# Altium PCB LED_grow_panel.PcbDoc
Units mm, origin at the board's own origin, x right, y up, seen from the top; angles counter-clockwise.
Board outline 100 x 100 mm, 2 copper layers (Top Layer, Bottom Layer), stack 1.736 mm thick; 59 components, 35 nets, 184 pads, 0 vias.
Unrouted connection lines stored in the file: 4.
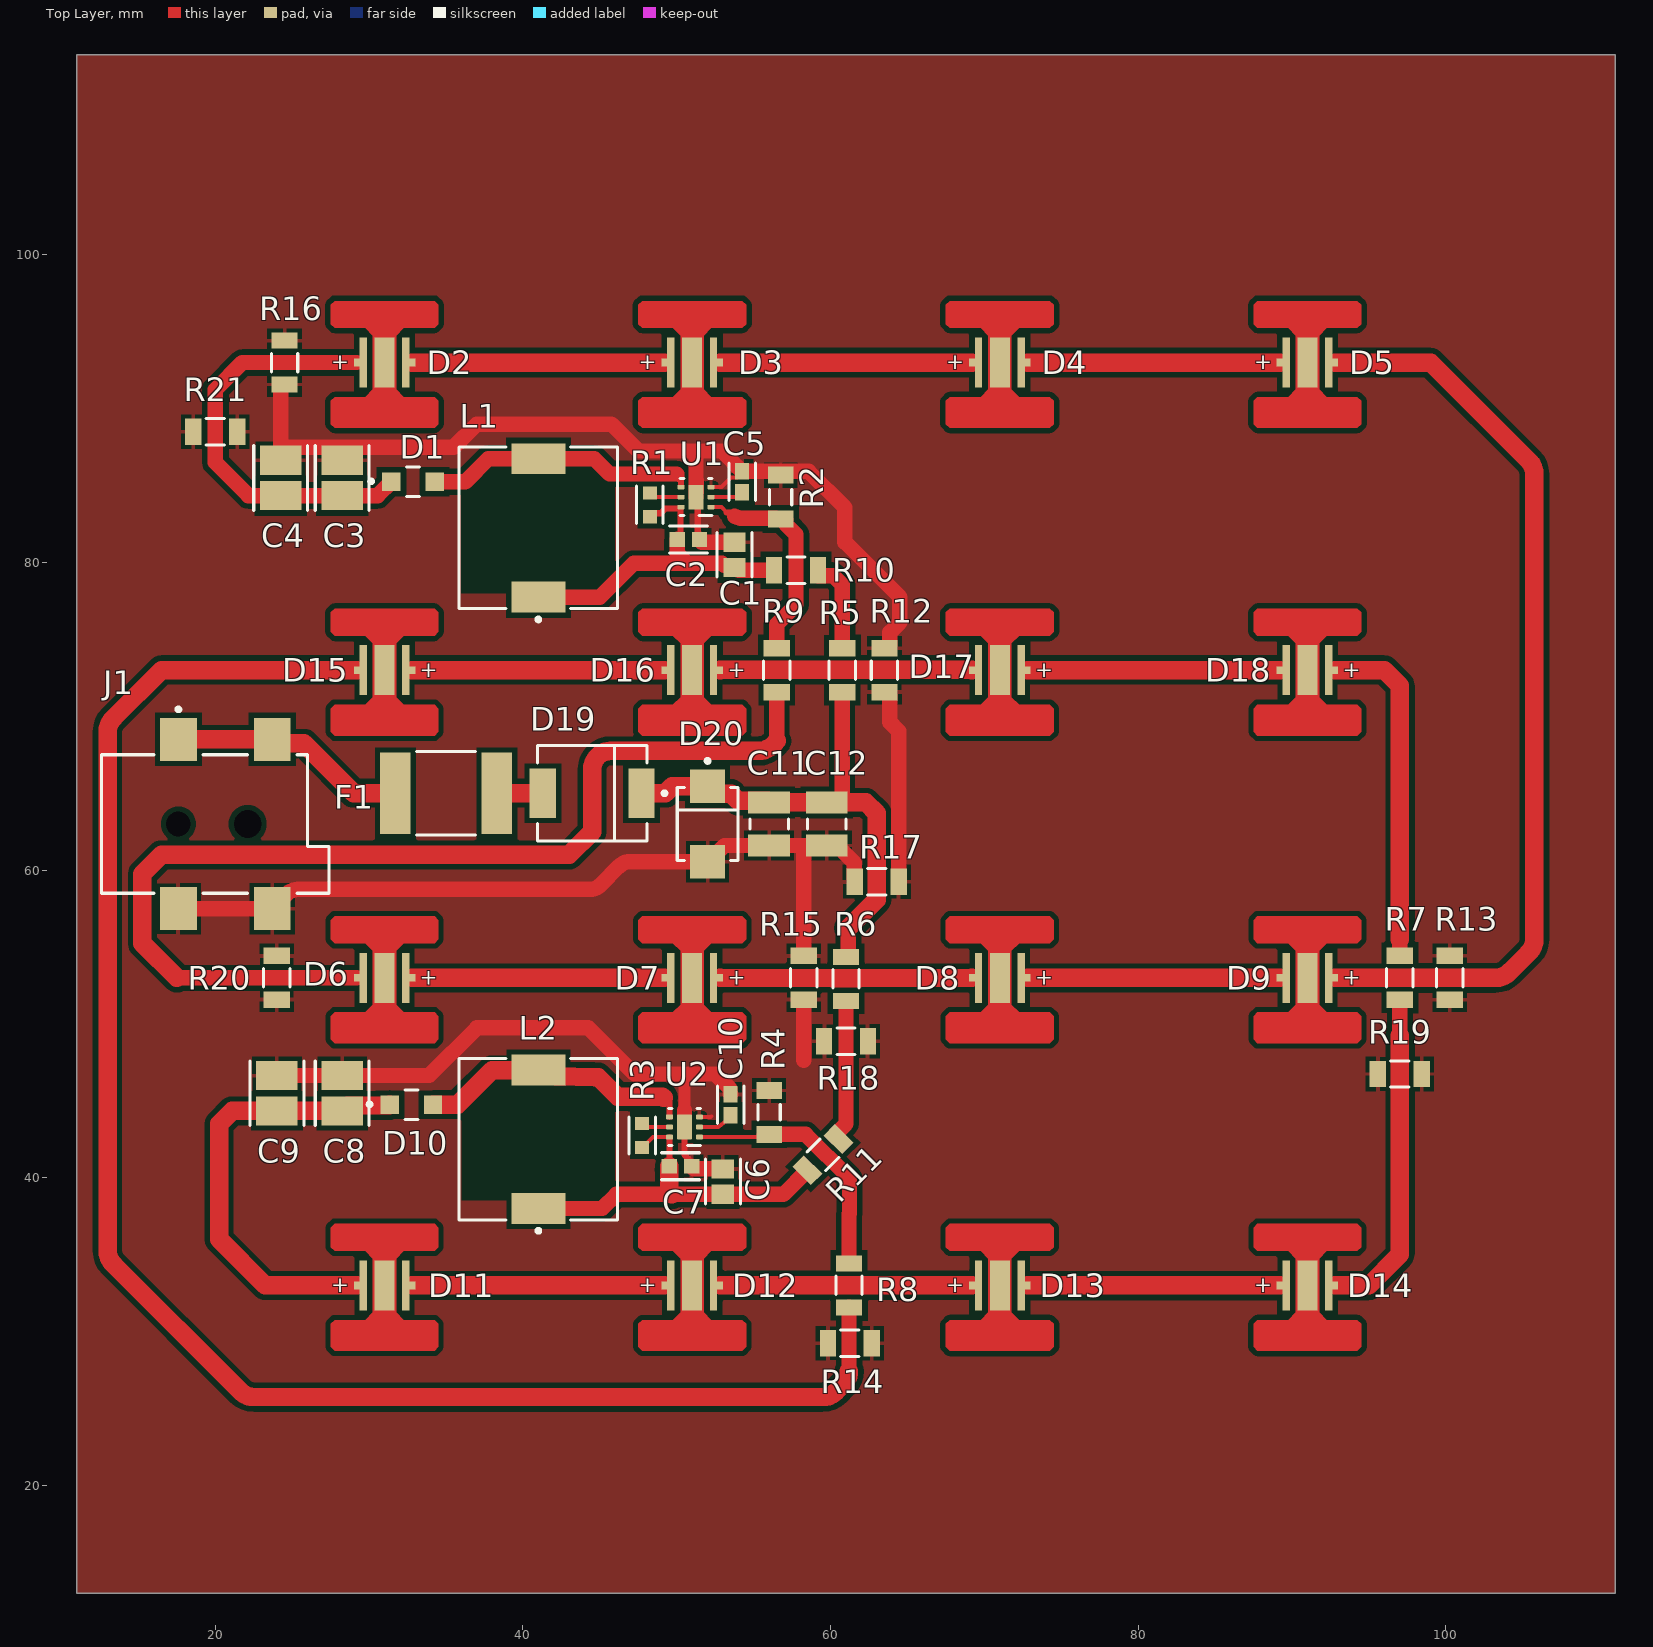
[diagram p0: Top Layer view]
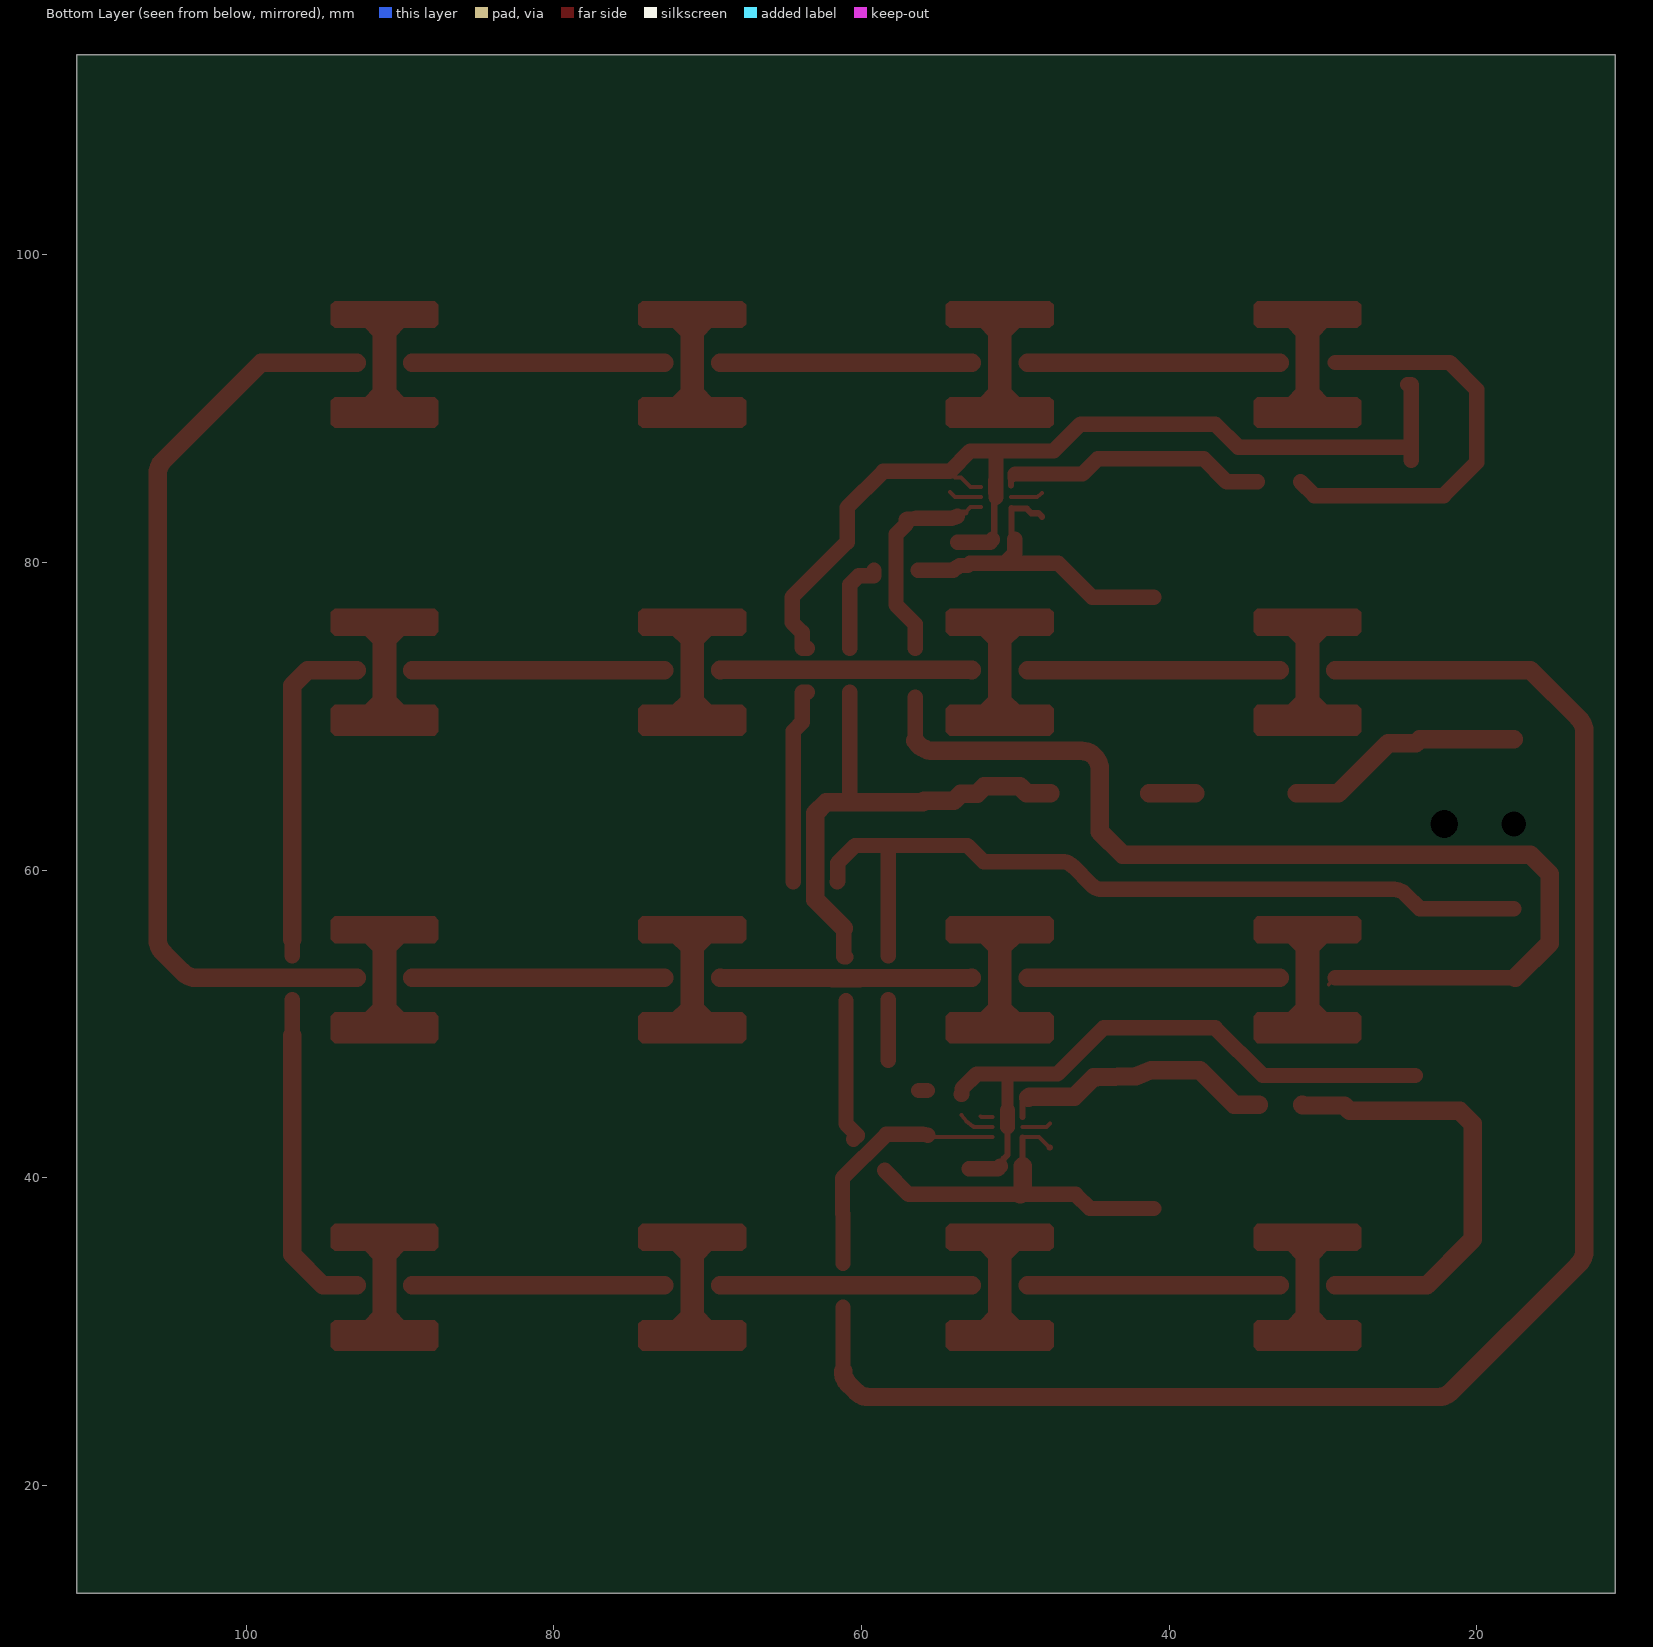
[diagram p1: Bottom Layer view, seen from below]

## Layer stack, top to bottom
Top Solder: solder mask 0.0102, Solder Resist, Dk 3.5
Top Layer: signal copper 0.0356
Dielectric 1: dielectric 0.1, Thermally conductive, Dk 4.8
Bottom Layer: signal copper 1.6
Bottom Solder: solder mask 0.0102, Solder Resist, Dk 3.5

## Board outline
11,13 11,113 111,113 111,13

## Design rules (kind name [scope] priority, off if disabled: settings)
Clearance [All] p1: gap=0.15 ignorepadtopadclearanceinfootprint=FALSE except(0.35: Arc-Fill Arc-Poly Arc-Region Track-Fill Track-Poly Track-Region SMDPad-Fill SMDPad-Poly SMDPad-Region THPad-Fill THPad-Poly THPad-Region Fill-Fill Fill-Poly Fill-Region Poly-Poly Poly-Region Region-Region)
PolygonConnect [All] p1: connectstyle=Relief reliefconductorwidth=0.254 reliefentries=4 polygonreliefangle="90 Angle" airgapwidth=0.254
RoutingVias [All] p1: holewidth=0.711 width=1.27 viastyle="Through Hole" minholewidth=0.711 minwidth=1.27 maxholewidth=0.711 maxwidth=1.27
SolderMaskExpansion [All] p1: expansion=0.102 istentingtop=FALSE
Width [All] p1: maxlimit=1.2 minlimit=0.254 preferedwidth=0.254
30 further rules are at their usual default settings.

## Components (designator, comment, footprint, x,y, rotation, side; value= is the part's Value field where it differs from the comment)
C1 "GRM21BZ71E475KE15L" FP-GRM21B-0_2-e0_2_0_7-IPC_B 53.75,80.5 r90 top value=4.7µF
C2 "C0603C104K5RACTU" FP-C0603C-CF-IPC_B 50.75,81.5 r0 top value="0.10 μF"
C3 "GCM32ER71H475KA55K" FP-GCM32E-0_3-IPC_B 28.25,85.5 r270 top
C4 "GCM32ER71H475KA55K" FP-GCM32E-0_3-IPC_B 24.25,85.5 r270 top
C5 "CC0603KRX7R9BB224" FP-CC0603-DA-IPC_B 54.25,85.25 r90 top value="220 nF"
C6 "GRM21BZ71E475KE15L" FP-GRM21B-0_2-e0_2_0_7-IPC_B 53,39.75 r90 top value=4.7µF
C7 "C0603C104K5RACTU" FP-C0603C-CF-IPC_B 50.25,40.75 r0 top value="0.10 μF"
C8 "GCM32ER71H475KA55K" FP-GCM32E-0_3-IPC_B 28.25,45.5 r270 top
C9 "GCM32ER71H475KA55K" FP-GCM32E-0_3-IPC_B 24,45.5 r270 top
C10 "CC0603KRX7R9BB224" FP-CC0603-DA-IPC_B 53.5,44.75 r90 top value="220 nF"
C11 "C1210C226K3RACTU" FP-C1210C226K3RACTU-IPC_B 56,63 r270 top value=22uF
C12 "C1210C226K3RACTU" FP-C1210C226K3RACTU-IPC_B 59.75,63 r270 top value=22uF
D1 "PMEG6020ER,115" FP-SOD123W-MFG 32.85,85.25 r0 top
D2 "150353DS74500" WL-SMDC_3535 -1239,-1177 r180 top
D3 "150353DS74500" WL-SMDC_3535 -1219,-1177 r180 top
D4 "150353DS74500" WL-SMDC_3535 -1199,-1177 r180 top
D5 "150353DS74500" WL-SMDC_3535 -1179,-1177 r180 top
D6 "150353DS74500" WL-SMDC_3535 1301,1323 r0 top
D7 "150353DS74500" WL-SMDC_3535 1321,1323 r0 top
D8 "150353DS74500" WL-SMDC_3535 1341,1323 r0 top
D9 "150353DS74500" WL-SMDC_3535 1361,1323 r0 top
D10 "PMEG6020ER,115" FP-SOD123W-MFG 32.75,44.75 r0 top
D11 "150353FS74500" WL-SMDC_3535 -1239,-1237 r180 top
D12 "150353FS74500" WL-SMDC_3535 -1219,-1237 r180 top
D13 "150353FS74500" WL-SMDC_3535 -1199,-1237 r180 top
D14 "150353FS74500" WL-SMDC_3535 -1179,-1237 r180 top
D15 "150353FS74500" WL-SMDC_3535 1301,1343 r0 top
D16 "150353FS74500" WL-SMDC_3535 1321,1343 r0 top
D17 "150353FS74500" WL-SMDC_3535 1341,1343 r0 top
D18 "150353FS74500" WL-SMDC_3535 1361,1343 r0 top
D19 "SSC54-E3/57T" FP-95402-MFG 44.5,65 r180 top
D20 "P6SMB18A" FP-P6SMB-MFG 52,63 r270 top
F1 "MF-LSMF200/33X" FP-MF-LSMF-MFG 35,65 r0 top value=0.045-0.15Ω
J1 "PJ-002AH-SMT-TR" CUI-PJ-002AH-4_V 20,63 r0 top
L1 "7447713220" WE-PD_1030P -1229,-1187.75 r180 top
L2 "7447713220" WE-PD_1030P -1229,-1227.5 r180 top
R1 "RC0603FR-07100KL" FP-RC0603-0_55-IPC_B 48.25,83.75 r90 top
R2 "ERJ8BQFR56V" RESC3216X70X50NL05T20 56.75,84.25 r270 top value=560mΩ
R3 "RC0603FR-07100KL" FP-RC0603-0_55-IPC_B 47.75,42.75 r90 top
R4 "ERJ8BQFR56V" RESC3216X70X50NL05T20 56,44.25 r270 top value=560mΩ
R5 "RC1206JR-070RL" FP-RC1206-IPC_B 60.75,73 r90 top value=0Ω
R6 "RC1206JR-070RL" FP-RC1206-IPC_B 61,52.927 r270 top value=0Ω
R7 "RC1206JR-070RL" FP-RC1206-IPC_B 97,53 r90 top value=0Ω
R8 "RC1206JR-070RL" FP-RC1206-IPC_B 61.193,33 r270 top value=0Ω
R9 "RC1206JR-070RL" FP-RC1206-IPC_B 56.5,73 r270 top value=0Ω
R10 "RC1206JR-070RL" FP-RC1206-IPC_B 57.75,79.5 r180 top value=0Ω
R11 "RC1206JR-070RL" FP-RC1206-IPC_B 59.5,41.5 r225 top value=0Ω
R12 "RC1206JR-070RL" FP-RC1206-IPC_B 63.5,73 r90 top value=0Ω
R13 "RC1206JR-070RL" FP-RC1206-IPC_B 100.25,53 r90 top value=0Ω
R14 "RC1206JR-070RL" FP-RC1206-IPC_B 61.25,29.25 r0 top value=0Ω
R15 "RC1206JR-070RL" FP-RC1206-IPC_B 58.25,53 r90 top value=0Ω
R16 "RC1206JR-070RL" FP-RC1206-IPC_B 24.5,93 r90 top value=0Ω
R17 "RC1206JR-070RL" FP-RC1206-IPC_B 63,59.25 r180 top value=0Ω
R18 "RC1206JR-070RL" FP-RC1206-IPC_B 61,48.875 r0 top value=0Ω
R19 "RC1206JR-070RL" FP-RC1206-IPC_B 97,46.75 r0 top value=0Ω
R20 "RC1206JR-070RL" FP-RC1206-IPC_B 24,53 r90 top value=0Ω
R21 "RC1206JR-070RL" FP-RC1206-IPC_B 20,88.5 r0 top value=0Ω
U1 "TPS61165DRVT" DRV0006A_V 51.25,84.25 r180 top
U2 "TPS61165DRVT" DRV0006A_V 50.5,43.3 r180 top

## Footprints (in the part's own frame and the unit in brackets; to place one, negate y for a bottom-side part, rotate by r counter-clockwise, add the part's x,y. Pads: shape width x height; smd on the part's side, far side on the other; paste and mask are expansions set on the pad)
CUI-PJ-002AH-4_V [mm] "SMD, 4-Leads, Body 14.8x9 mm, Pitch 6.1mm"
  rect 2.4x2.8 smd: 1(-2.4,5.5) 1(3.7,5.5) 2(-2.4,-5.5) 3(3.7,-5.5)
  round 0 hole 1.6: MH1(-2.4,0)
  round 0 hole 1.8: MH2(2.1,0)
  silkscreen extent -7.4,-4.5 7.4,7.57, body extent -7.4,-6.3 7.4,6.3, height 11.2
DRV0006A_V [mm] "SON, 6-Leads, Body 2x2mm, Pitch 0.65mm, Thermal Pad 1.6x1mm, TI Recommended"
  rrect33% 0.45x0.3 smd: 1(-0.975,0.65) 2(-0.975,0) 3(-0.975,-0.65) 4(0.975,-0.65) 5(0.975,0) 6(0.975,0.65)
  rrect14% 1x0.7 on Top Paste: 7(0,0.45) 7(0,-0.45)
  rrect10% 1x1.6 smd paste-0.5: 7(0,0)
  silkscreen extent -1.05,-1.2 1.05,1.2, body extent -1.05,-1.05 1.05,1.05, height 0.81
FP-95402-MFG [mm]
  rect 1.72x3.2 smd paste+0 mask+0: 1(-3.205,0) 2(3.205,0)
  silkscreen extent -4.83,-3.11 3.55,3.11, body extent -4.17,-3.21 4.17,3.21, height 0.25
FP-C0603C-CF-IPC_B [mm]
  rect 1.007x0.958 smd paste+0 mask+0: 1(-0.726,0) 2(0.726,0)
  silkscreen extent -1.23,-0.88 1.23,0.88, body extent -1.48,-0.73 1.48,0.73, height 0.25
FP-C1210C226K3RACTU-IPC_B [mm]
  rect 1.403x2.726 smd paste+0 mask+0: 1(-1.4,0) 2(1.4,0)
  silkscreen extent -0.32,-1.25 0.32,1.25, body extent -2.35,-1.61 2.35,1.61, height 0.25
FP-CC0603-DA-IPC_B [mm]
  rect 1.058x0.912 smd paste+0 mask+0: 1(-0.677,0) 2(0.677,0)
  silkscreen extent -1.21,-0.86 1.21,0.86, body extent -1.46,-0.71 1.46,0.71, height 0.25
FP-GCM32E-0_3-IPC_B [mm]
  rect 1.903x2.706 smd paste+0 mask+0: 1(-1.151,0) 2(1.151,0)
  silkscreen extent -2.1,-1.75 2.1,1.75, body extent -2.35,-1.6 2.35,1.6, height 0.25
FP-GRM21B-0_2-e0_2_0_7-IPC_B [mm]
  rect 1.255x1.456 smd paste+0 mask+0: 1(-0.826,0) 2(0.826,0)
  silkscreen extent -1.45,-1.13 1.45,1.13, body extent -1.7,-0.98 1.7,0.98, height 0.25
FP-MF-LSMF-MFG [mm]
  rect 2x5.3 smd paste+0 mask+0: 1(-3.3,0) 2(3.3,0)
  silkscreen extent -1.92,-2.72 1.92,2.72, body extent -4.4,-2.82 4.4,2.82, height 0.25
FP-P6SMB-MFG [mm]
  rect 2.16x2.26 smd paste+0 mask+0: 1(-2.45,0) 2(2.45,0)
  silkscreen extent -4.22,-1.97 2.37,1.97, body extent -3.63,-2.07 3.63,2.07, height 0.25
FP-RC0603-0_55-IPC_B [mm]
  rect 0.859x0.912 smd paste+0 mask+0: 1(-0.777,0) 2(0.777,0)
  silkscreen extent -1.21,-0.86 1.21,0.86, body extent -1.46,-0.71 1.46,0.71, height 0.25
FP-RC1206-IPC_B [mm]
  rect 1.058x1.712 smd paste+0 mask+0: 1(-1.427,0) 2(1.427,0)
  silkscreen extent -0.6,-0.86 0.6,0.86, body extent -2.21,-1.11 2.21,1.11, height 0.25
FP-SOD123W-MFG [mm]
  rect 1.2x1.2 smd paste-1000 mask+0: 1(-1.4,0) 2(1.4,0)
  silkscreen extent -2.85,-0.95 0.43,0.95, body extent -2.2,-1.05 2.2,1.05, height 0.25
RESC3216X70X50NL05T20 [mm] "Chip Resistor, 2-Leads, Body 3.20x1.60mm, IPC Medium Density"
  rect 1.1x1.65 smd: 1(-1.425,0) 2(1.425,0)
  silkscreen extent -0.5,-0.72 0.5,0.72, body extent -1.63,-0.82 1.62,0.82, height 0.7
WE-PD_1030P [mm] "SMD Shielded Power Inductor, 2-leads, body 10x10mm"
  rect 3.5x2 smd: 1(-1270,-1265.5) 2(-1270,-1274.5)
  silkscreen extent -1275.15,-1275.25 -1264.85,-1263.93, body extent -1275,-1275 -1265,-1265, height 2.85
WL-SMDC_3535 [mm] "SMD Mono-color Ceramic LED Waterclear, body 3.4x3.4mm, 2-leads"
  rect 0.375x0.5 smd: 1(-1271.813,-1270) 2(-1268.187,-1270)
  rect 0.48x3.25 smd: 1(-1271.385,-1270) 2(-1268.615,-1270)
  rect 1.3x3.25 smd: "Thermal Pad"(-1270,-1270)
  body extent -1271.7,-1271.7 -1268.3,-1268.3, height 2.1

## Part data
C1 C6: library part CMP-06035-039079-1, "Chip Multilayer Ceramic Capacitors for General Purpose, 0805, 4.7uF, X7R, 15%, 10%, 25V", Case/Package=0805, Dielectric Material=Ceramic, Manufacturer=Murata, Manufacturer Lifecycle Status="IN PRODUCTION", Max Operating Temperature=125°C, Min Operating Temperature=-55°C, Supplier Part Number=490-GRM21BZ71E475KE15LCT-ND, Tolerance=10%, Voltage Rating=25V, Category="Ceramic Capacitors", ComponentLink1Description=https://datasheet.octopart.com:443/GRM21BZ71E475KE15L-Murata-datasheet-155345087.pdf?src-supplier=Newark, ComponentLink1URL=https://datasheet.octopart.com:443/GRM21BZ71E475KE15L-Murata-datasheet-155345087.pdf?src-supplier=Newark, ComponentLink2Description=https://datasheet.octopart.com:443/GRM21BZ71E475KE15L-Murata-datasheet-141278877.pdf?src-supplier=Geoflip, ComponentLink2URL=https://datasheet.octopart.com:443/GRM21BZ71E475KE15L-Murata-datasheet-141278877.pdf?src-supplier=Geoflip, ComponentLink3Description=https://datasheet.octopart.com:443/GRM21BZ71E475KE15L-Murata-datasheet-165579666.pdf?src-supplier=TME, ComponentLink3URL=https://datasheet.octopart.com:443/GRM21BZ71E475KE15L-Murata-datasheet-165579666.pdf?src-supplier=TME, ComponentLink4Description=https://datasheet.octopart.com:443/GRM21BZ71E475KE15L-Murata-datasheet-140707839.pdf?src-supplier=Ciiva, ComponentLink4URL=https://datasheet.octopart.com:443/GRM21BZ71E475KE15L-Murata-datasheet-140707839.pdf?src-supplier=Ciiva, ComponentLink5Description=https://datasheet.octopart.com:443/GRM21BZ71E475KE15L-Murata-datasheet-138745135.pdf?src-supplier=Ciiva, ComponentLink5URL=https://datasheet.octopart.com:443/GRM21BZ71E475KE15L-Murata-datasheet-138745135.pdf?src-supplier=Ciiva, ComponentLink6Description=http://sigma.octopart.com:80/reach_statement/Murata-company-16.pdf?src-supplier=Compliance+Statements, ComponentLink6URL=http://sigma.octopart.com:80/reach_statement/Murata-company-16.pdf?src-supplier=Compliance+Statements, Export Control Classification Number (ECCN) Code=EAR99, Harmonized Tariff Schedule (HTS) Code=8532.24.00.20, Height=1.25mm, Introduction Date=2017-02-22, Length=2mm, Lifecycle Status=Production, Manufacturer Part Number=GRM21BZ71E475KE15L, Material=Ceramic, Mounting Technology="Surface Mount", Number of Terminals=2, Pricing="1=0,28, 10=0,164, 50=0,1184, 100=0,1046, 500=0,08132, 1000=0,07413 (USD)", REACH SVHC=Yes, RoHS=Compliant, Stock=127456, Supplier=DigiKey, Thickness=1.25mm, Voltage Rating (DC)=25V, Width=1.25mm
C2 C7: library part CMP-2006-03061-2, "CAP CER 0.1UF 50V X7R 0603", Capacitance="0.10 μF", Manufacturer=KEMET, Package=C0603C-CF, Temperature="-55°C to +125°C", Temperature Characteristic=X7R, Temperature Coefficient=30ppm/°C, Temperature Range High=+125°C, Temperature Range Low=-55°C, Tolerance=0.1, Voltage Rating="50 V", Automotive=Yes, Automotive Grade="Grade 1", Category=Cap, ComponentLink2Description=Datasheet, ComponentLink2URL=https://api.kemet.com/component-edge/download/datasheet/C0603C100J5GACAUTO.pdf, Device Class L1="Passive Components", Device Class L2=Capacitors, Device Class L3="Ceramic Capacitors", Digikey Description="CAP CER 0.1UF 50V X7R 0603", Height=0.87mm, Lead Free=Yes, Manufacturer Part Number=C0603C104K5RACTU, Material=Ceramic, Octopart=https://octopart.com/c0603c104k5ractu-kemet-139244, RoHS=TRUE
C3 C4 C8 C9: library part CMP-06035-058874-1, "Ceramic Capacitor for Automotive 4.7uF ±10% 50VDC X7R 1210 Embossed T/R", Capacitance=4.7uF, Case Code (Imperial)=1210, Case Code (Metric)=3225, Dielectric=X7R, Max Operating Temperature=125°C, Min Operating Temperature=-55°C, Package Quantity=1, Ratings=AEC-Q200, Tolerance=10%, Voltage Rating=50V, Case/Package=1210, Depth=2.5mm, Height=2.5mm, Length=3.2mm, Mount="Surface Mount", Packaging="Tape and Reel", Radiation Hardening=No, Termination=SMD/SMT, Thickness=0.106inch, Voltage Rating (DC)=50V, Width=0.098inch
C5 C10: library part CMP-03422-001373-1, "0.22µF 50V Ceramic Capacitor X7R 0603 (1608 Metric) 0.063\" L x 0.031\" W (1.60mm x 0.80mm)", Capacitance="220 nF", Manufacturer=YAGEO, Package=CC0603-DA, Temperature="-55°C to +125°C", Temperature Characteristic=X7R, Temperature Coefficient=15%, Temperature Range High=+125°C, Temperature Range Low=-55°C, Tolerance=0.1, Voltage="50 V", Automotive=No, Category=Cap, ComponentLink2Description=Datasheet, ComponentLink2URL=http://www.yageo.com/documents/recent/UPY-GPHC_X7R_6.3V-to-50V_18.pdf, Device Class L1="Passive Components", Device Class L2=Capacitors, Device Class L3="Ceramic Capacitors", Digikey Description="0.22µF 50V Ceramic Capacitor X7R 0603 (1608 Metric) 0.063\" L x 0.031\" W (1.60mm x 0.80mm)", Footprint Url=http://www.yageo.com/exep/pages/download/literatures/UPY-C_GEN_24.pdf, Height=0.9mm, Lead Free=Yes, Manufacturer Part Number=CC0603KRX7R9BB224, Material=Ceramic, Mouser Description="0603 50 V 0.22 uF ±10% Tolerance X7R Multilayer Ceramic Capacitor", Octopart=https://octopart.com/cc0603krx7r9bb224-yageo-30314039, RoHS=TRUE, Voltage Rating="50 V"
C11 C12: library part CMP-03020-016899-1, "CAP CER 22UF 25V X7R 1210", Capacitance=22uF, Manufacturer=KEMET, Temperature="-55°C to +125°C", Temperature Characteristic=X7R, Temperature Coefficient=15%, Temperature Range High=+125°C, Temperature Range Low=-55°C, Tolerance=10%, Voltage Rating=25V, Automotive=No, Category=Cap, ComponentLink2Description=Datasheet, ComponentLink2URL=https://content.kemet.com/datasheets/KEM_C1002_X7R_SMD.pdf, Device Class L1="Passive Components", Device Class L2=Capacitors, Device Class L3="Ceramic Capacitors", Digikey Description="CAP CER 22UF 25V X7R 1210", Height=2.8mm, Ipc Land Pattern Name=CAPC320250X250, Lead Free=Yes, Manufacturer Part Number=C1210C226K3RACTU, Material=Ceramic, Mouser Description="1210 C1210C 22uF Ceramic Multilayer Capacitor, 25V dc, +125C, X7R Dielectric, +/-10%", Octopart=https://octopart.com/c1210c226k3ractu-kemet-56838491, Package=C1210C226K3RACTU, RoHS=TRUE
D1 D10: library part CMP-14398-000024-1, "DIODE SCHOTTKY 60V 2A SOD123W", RoHS Compliant=Yes
D2 D3 D4 D5 D6 D7 D8 D9: library part CMP-03913-90235581-2, "WL-SMDC SMT Mono-color Ceramic LED Waterclear Hort", Forward Current=1.5A, Forward Voltage=3.2V, Manufacturer="Wurth Elektronik", Manufacturer Lifecycle Status=ACTIVE, Max Operating Temperature=100°C, Max Reverse Voltage (DC)=5V, Min Operating Temperature=-40°C, Supplier Part Number=732-12002-1-ND, Category=LEDs, ComponentLink1Description=https://datasheet.octopart.com:443/150353DS74500-Wurth-Elektronik-datasheet-168474468.pdf?src-supplier=Newark, ComponentLink1URL=https://datasheet.octopart.com:443/150353DS74500-Wurth-Elektronik-datasheet-168474468.pdf?src-supplier=Newark, Height=2.1mm, Length=3.4mm, Lifecycle Status=Production, Manufacturer Part Number=150353DS74500, Packaging="Tape and Reel", Peak Wavelength=450nm, Pricing="1=3,93, 10=3,631, 100=3,334, 500=2,594 (USD)", RoHS=Compliant, Stock=694, Supplier=DigiKey, Viewing Angle=125°, Wavelength=450nm, Width=3.4mm, YEOL="1 = Estimated lifetime > 10 years"
D11 D12 D13 D14 D15 D16 D17 D18: library part CMP-03913-90235582-2, "WL-SMDC SMT Mono-color Ceramic LED Waterclear Hort", Forward Current=1.5A, Forward Voltage=1.8V, Manufacturer="Wurth Elektronik", Manufacturer Lifecycle Status=ACTIVE, Max Operating Temperature=100°C, Max Reverse Voltage (DC)=5V, Min Operating Temperature=-40°C, Supplier Part Number=732-12003-1-ND, Category=Optoelectronics, ComponentLink1Description=https://datasheet.octopart.com:443/150353FS74500-Wurth-Elektronik-datasheet-168474492.pdf?src-supplier=Newark, ComponentLink1URL=https://datasheet.octopart.com:443/150353FS74500-Wurth-Elektronik-datasheet-168474492.pdf?src-supplier=Newark, Height=2.1mm, Length=3.4mm, Lifecycle Status=Production, Manufacturer Part Number=150353FS74500, Packaging="Tape and Reel", Peak Wavelength=730nm, Pricing="1=6,48, 10=5,987, 100=5,499, 500=4,278 (USD)", RoHS=Compliant, Stock=580, Supplier=DigiKey, Viewing Angle=125°, Wavelength=730nm, Width=3.4mm, YEOL="1 = Estimated lifetime > 10 years"
D19: library part CMP-02539-000015-1, "DIODE SCHOTTKY 40V 5A DO214AB", Forward Current=5A, Manufacturer=Vishay, Max Junction Temp=+150°C, Max Repetitive Reverse Voltage=40V, Max Surge Forward Current=175A, Package=95402, Peak Reverse Current=0.5mA, Temperature="-65°C to +150°C", Temperature Range Low=-65°C, Automotive=No, Category=Diode, ComponentLink2Description=Datasheet, ComponentLink2URL=http://www.vishay.com/docs/88885/ssc53l.pdf, Device Class L1="Discrete Semiconductors", Device Class L2=Diodes, Device Class L3="Schottky Diodes", Digikey Description="DIODE SCHOTTKY 40V 5A DO214AB", Footprint Url=https://www.vishay.com/docs/95402/smc.pdf, Height=2.62mm, Lead Free=Yes, Manufacturer Part Number=SSC54-E3/57T, Mouser Description="SSC54 Series 40 V 5 A Surface Mount Schottky Rectifier - DO-214AB", Octopart=https://octopart.com/ssc54-e3%2F57t-vishay-39552944, Reverse Voltage=40V, RoHS=TRUE, Standoff Height=0mm, Temperature Range High=+150°C
D20: library part CMP-08607-000078-1, "TVS DIODE 15.3V 25.5V DO214AA", Breakdown Voltage=17.1V, Clamping Voltage=25.5V, Manufacturer="Littelfuse Inc", Max Junction Temp=+150°C, Package=P6SMB, Peak Pulse Current=24.2A, Peak Pulse Power=600W, Reverse Standoff Voltage=15.3V, Temperature="-65°C to +150°C", Temperature Range Low=-65°C, Automotive=No, Category=Diode, ComponentLink2Description=Datasheet, ComponentLink2URL=https://www.littelfuse.com/~/media/electronics/datasheets/tvs_diodes/littelfuse_tvs_diode_p6smb_datasheet.pdf.pdf, Device Class L1="Circuit Protection", Device Class L2="TVS Diodes", Device Class L3=unset, Digikey Description="TVS DIODE 15.3V 25.5V DO214AA", Direction=Unidirectional, Height=2.61mm, Lead Free=Yes, Manufacturer Part Number=P6SMB18A, Mouser Description="P6SMB Series 15.3 V 600 W Surface Mount Uni-Directional TVS Diode - DO-214AA", Number Of Channels=1, Octopart=https://octopart.com/p6smb18a-littelfuse-8918162, RoHS=TRUE, Temperature Range High=+150°C
F1: library part CMP-07400-000015-1, "PTC RESET FUSE 33V 2A 2920", Current Rating=40A, Hold Current=1.85A, Manufacturer=Bourns, Package=MF-LSMF, Resistance=0.045-0.15Ω, Temperature="-40°C to +85°C", Temperature Range High=+85°C, Temperature Range Low=-40°C, Trip Current=3.7A, Voltage Rating=33V, Automotive=Yes, Automotive Grade="Grade 3", Category=Fuse, ComponentLink2Description=Datasheet, ComponentLink2URL=https://www.bourns.com/docs/Product-Datasheets/mflsmf.pdf, Device Class L1="Circuit Protection", Device Class L2="PTC Resettable Fuses", Device Class L3=unset, Digikey Description="PTC RESET FUSE 33V 1.85A 2920", Height=1.6mm, Lead Free=Yes, Manufacturer Part Number=MF-LSMF200/33X, Mouser Description="Resettable Fuses - PPTC 1.85A 33V 0.045ohm SMD 2920", Octopart=https://octopart.com/mf-lsmf185%2F33x-2-bourns-19504849, RoHS=TRUE, Trip Time=2.5s
J1: library part CMP-2000-06896-2, "DC Power Jack, Right Angle, -25 to 85 degC, 4-Pin 14.8 x 9 x 11 mm SMD, RoHS, Tape and Reel", Current Rating=5A, Flammability Rating=UL94V-0, Insulation Resistance=100MOhms, Manufacturer=CUIInc., Operating Temperature Range=-25Cto+85C, Package Description="4-Pin Surface Mount Device, Body 14.8 x 9 mm, Pitch 6.1 mm", Package Reference=PJ-002AH, Voltage Rating=24V, Brand=CUI, Connector Type=DCPowerJack, Contact Gender=Male, Contact Material=Brass, Contact Plating=Nickel, Datasheet URL=http://www.cui.com/product/resource/pj-002ah-smt.pdf, Datasheet Version="Rev. 1.03, 11/2012", Factory Pack Quantity=350, Housing Material=Polyamide(PA), Inside Contact Diameter=2mm, Manufacturer URL=http://www.cui.com/, Mounting Angle=Right, Mounting Style=SMD/SMT, Mounting Technology=SurfaceMount, Outside Contact Diameter=6.5mm, Packaging=Reel, PartNumber=PJ-002AH, Product=Jacks, Product Category=DCPowerConnectors, RoHS=True, Termination Style=SMD/SMT
L1 L2: library part CMP-1396-00012-3, "WE-PD Performance SMT Shielded Power Inductor", Ambient Temperature Range High=110°C, Ambient Temperature Range Low=-40°C, Current Rating=1.7A, DC Resistance (DCR)=111mΩ, Inductance=22µH, Inductance Tolerance=20%, Max Operating Temperature=150°C, Self Resonant Frequency=17.5MHz, Height=3mm, Length=10mm, Min Operating Temperature=-40°C, Number of Pins=2, RoHS=Compliant, Width=10mm
R1 R3: library part CMP-2100-03662-2, "RES SMD 100K OHM 1% 1/10W 0603", Case Code (Imperial)=0603, Case Code (Metric)=1608, Max Operating Temperature=155°C, Max Power Dissipation=100mW, Min Operating Temperature=-55°C, Resistance=100kR, Resistance Tolerance=1%, Resistor Type="Thick Film", Temperature Coefficient=100ppm/°C, Voltage Rating=50V, Working Voltage=75V, Case/Package=0603, Construction=Rectangular, Depth=0.8mm, Features="Moisture Resistant", Height=0.45mm, Lead Free="Lead Free", Length=1.6mm, Military Standard=Not, Number of Pins=2, Number of Terminations=2, Packaging="Tape and Reel", Power Rating=100mW, REACH SVHC="No SVHC", RoHS Compliant=Yes, Series=RC, Technology="THICK FILM", Termination=SMD/SMT, Tolerance=1%, Voltage Rating (DC)=50V, Width=0.8mm
R2 R4: library part CMP-2003-00756-1, Case Code (Imperial)=1206, Case Code (Metric)=3216, Manufacturer=Panasonic, Manufacturer Lifecycle Status=ACTIVE, Max Operating Temperature=155°C, Max Power Dissipation=500mW, Min Operating Temperature=-55°C, Ratings=AEC-Q200, Supplier Part Number=P17251CT-ND, Temperature Coefficient=250ppm/°C, Tolerance=1%, Working Voltage=529.2mV, Case/Package=1206, Category="Chip SMD Resistors", ComponentLink1Description=https://datasheet.octopart.com:443/ERJ8BQFR56V-Panasonic-datasheet-175421125.pdf?src-supplier=IHS, ComponentLink1URL=https://datasheet.octopart.com:443/ERJ8BQFR56V-Panasonic-datasheet-175421125.pdf?src-supplier=IHS, ComponentLink2Description=https://datasheet.octopart.com:443/ERJ8BQFR56V-Panasonic-datasheet-68299093.pdf?src-supplier=Future+Electronics, ComponentLink2URL=https://datasheet.octopart.com:443/ERJ8BQFR56V-Panasonic-datasheet-68299093.pdf?src-supplier=Future+Electronics, ComponentLink3Description=https://datasheet.octopart.com:443/ERJ8BQFR56V-Panasonic-datasheet-159764274.pdf?src-supplier=Farnell, ComponentLink3URL=https://datasheet.octopart.com:443/ERJ8BQFR56V-Panasonic-datasheet-159764274.pdf?src-supplier=Farnell, ComponentLink4Description=https://datasheet.octopart.com:443/ERJ8BQFR56V-Panasonic-datasheet-15994758.pdf?src-supplier=Farnell, ComponentLink4URL=https://datasheet.octopart.com:443/ERJ8BQFR56V-Panasonic-datasheet-15994758.pdf?src-supplier=Farnell, ComponentLink5Description=https://datasheet.octopart.com:443/ERJ-8BQFR56V-Panasonic-datasheet-154766170.pdf?src-supplier=JRH+Electronics, ComponentLink5URL=https://datasheet.octopart.com:443/ERJ-8BQFR56V-Panasonic-datasheet-154766170.pdf?src-supplier=JRH+Electronics, ComponentLink6Description=https://datasheet.octopart.com:443/ERJ8BQFR56V-Panasonic-datasheet-5317253.pdf?src-supplier=RS+(Formerly+Allied+Electronics), ComponentLink6URL=https://datasheet.octopart.com:443/ERJ8BQFR56V-Panasonic-datasheet-5317253.pdf?src-supplier=RS+(Formerly+Allied+Electronics), ComponentLink7Description=https://datasheet.octopart.com:443/ERJ8BQFR56V-Panasonic-datasheet-164871471.pdf?src-supplier=Burklin+Elektronik, ComponentLink7URL=https://datasheet.octopart.com:443/ERJ8BQFR56V-Panasonic-datasheet-164871471.pdf?src-supplier=Burklin+Elektronik, ComponentLink8Description=https://datasheet.octopart.com:443/ERJ8BQFR56V-Panasonic-datasheet-13271236.pdf?src-supplier=Electro+Sonic, ComponentLink8URL=https://datasheet.octopart.com:443/ERJ8BQFR56V-Panasonic-datasheet-13271236.pdf?src-supplier=Electro+Sonic, ComponentLink9Description=https://datasheet.octopart.com:443/ERJ-8BQFR56V-Panasonic-datasheet-22087634.pdf?src-supplier=Electro+Sonic, ComponentLink9URL=https://datasheet.octopart.com:443/ERJ-8BQFR56V-Panasonic-datasheet-22087634.pdf?src-supplier=Electro+Sonic, Composition="Thick Film", Contact Plating=Tin, Country of Origin=Japan, Depth=1.6mm, Export Control Classification Number (ECCN) Code=EAR99, Features="Automotive AEC-Q200", Harmonized Tariff Schedule (HTS) Code=8533.21.00.30, Height=600µm, Introduction Date=2009-12-28, Length=3.2mm, Lifecycle Status=Production, Manufacturer Part Number=ERJ8BQFR56V, Military Standard=Not, Mounting Technology="Surface Mount", Number of Terminals=2, Number of Terminations=2, Packaging="Cut Tape", Part Number=ERJ8BQFR56V, Part Series="Current Sensing Resistors Thick Film Type", Pins=2, Power Rating=500mW, Pricing="1=0,29, 10=0,153, 25=0,1236, 50=0,1066, 100=0,0932, 250=0,07976, 500=0,072, 1000=0,06585 (USD)", Radiation Hardening=No, REACH SVHC=Yes, RoHS=Compliant, Schedule B=8533210045, Stock=1597, Supplier=DigiKey, Termination=SMD/SMT, Width=1.6mm
R5 R6 R7 R8 R9 R10 R11 R12 R13 R14 R15 R16 R17 R18 R19 R20 R21: library part CMP-2100-03681-2, "RES SMD 0 OHM JUMPER 1/4W 1206", Manufacturer=YAGEO, Package=RC1206, Power Rating=0.25W, Resistance=0Ω, Temperature="-55°C to +155°C", Temperature Coefficient=300ppm/°C, Temperature Range High=+155°C, Temperature Range Low=-55°C, Tolerance=5%, Voltage Rating=200V, Automotive=No, Category=Res, ComponentLink2Description=Datasheet, ComponentLink2URL=https://www.yageo.com/upload/media/product/productsearch/datasheet/rchip/PYu-RC_Group_51_RoHS_L_10.pdf, Composition="Thick Film", Device Class L1="Passive Components", Device Class L2=Resistors, Device Class L3="Chip SMD Resistors", Digikey Description="RES SMD 0 OHM JUMPER 1/4W 1206", Footprint Url=https://www.yageo.com/upload/website/yageo_PYu-R_Mount_10_19050818_343.pdf, Height=0.65mm, Ipc Land Pattern Name=RESC310160X55, Lead Free=Yes, Manufacturer Part Number=RC1206JR-070RL, Mouser Description="Resistor: thick film; SMD; 1206; 0O; 0.25W; ±5%; -55÷155°C", Octopart=https://octopart.com/rc1206jr-070rl-yageo-40025601, RoHS=TRUE, Series=RC
U1 U2: library part CMP-0388-00236-2, "High Brightness White LED Driver, 3 to 18 V, -40 to 85 degC, 6-pin SON (DRV6), Green (RoHS & no Sb/Br)", Manufacturer="Texas Instruments", Rating=Catalog, Switching Frequency(Max)(kHz)=1200, ComponentLink1Description="Manufacturer URL", ComponentLink1URL=http://www.ti.com/, ComponentLink2Description=Datasheet, ComponentLink2URL=http://www.ti.com/general/docs/lit/getliterature.tsp?genericPartNumber=TPS61165&fileType=pdf, ComponentLink3Description="Package Specification", ComponentLink3URL=http://www.ti.com/litv/pdf/mpds216d, DatasheetVersion=SLVS790B, Dimming=TRUE, Eco-Plan="Green (RoHS & no Sb/Br)", Iq(Typ)(mA)=1.5, Mounting Technology="Surface Mount", PackageDescription="6-Pin Plastic Small Outline No-Lead, Body 2 x 2 mm, Pitch 0.65 mm", PackageReference=DRV0006A, PackageVersion=4206925/E, PartNumber=TPS61165DRVT, SubFamily="White LED Driver", Synchronous Rectification=TRUE, Topology=Boost, Vin(Max)(V)=18, Vin(Min)(V)=3

## Nets (pads, with @x,y where several pads share a name; then routed paths per layer and width w, separated by ;. In a path a pad name is that pad's centre, name@x,y a point inside that pad or via, vN(x,y) a via of type N, cw(c..) or ccw(c..) an arc to the next point about the centre after c; other vN are vias at no path point)
GND: C1.2 C2.2 C3.1 C4.1 C5.2 C6.2 C7.2 C8.1 C9.1 C10.2 C11.2 C12.2 D20.2 J1.2 J1.3 R2.1 R4.1 R12.1 R12.2 R13.1 R13.2 R14.1 R14.2 R15.1 R15.2 R16.1 R16.2 R17.1 R17.2 R18.1 R18.2 R19.1 R19.2 R20.1 R20.2 R21.1 R21.2 U1.3 U1.7@51.25,84.25 U2.3 U2.7@50.5,43.3 | length 180.3
  Top Layer w0.254: U2.3 52.2,43.95 52.25,44 ; U1.3 52.9,84.9 53.525,85.525 53.921,85.525 54.25,85.854 C5.2
  Top Layer w0.4: U2.7@50.5,43.3 50.5,41.5 50.75,41.25 50.75,40.976 C7.2 ; U1.7@51.25,84.25 51.363,84.137 51.363,81.613 C2.2
  Top Layer w0.8: 50.5,44.387 50.5,46.75
  Top Layer w1: J1.2 J1.3 24.658,58.458 cw(c25.364,57.75) 25.364,58.75 44.336,58.75 ccw(c44.336,59.75) 45.043,59.043 46.258,60.258 cw(c46.964,59.55) 46.964,60.55 D20.2 52.05,60.55 53.1,61.6 C11.2 58.25,61.6 ; C9.1 C8.1 33.901,46.651 37,49.75 44.25,49.75 47.25,46.75 50.5,46.75 52.5,46.75 53.456,45.794 53.456,45.456 53.485,45.427 C10.2 ; C4.1 24.25,86.75 C4.1@24.25,87.5 ; R16.1 24.279,91.573 24.25,91.544 C4.1@24.25,87.5 ; U2.7@50.5,43.3 50.5,43.6 50.504,43.604 50.504,44.383 50.5,44.387 ; C7.2 50.976,40.732 51.132,40.576 C6.2 ; U1.7@51.25,84.25 51.25,84.55 51.254,84.554 51.254,85.333 51.25,85.337 51.25,87.25 ; C2.2 51.476,81.482 51.632,81.326 C1.2 ; R4.1@55.725,45.675 R4.1 R4.1@56.275,45.675 ; 58.25,47.65 R15.1 ; R15.2 58.25,61.6 ; R17.2 61.544,59.279 61.544,60.467 60.411,61.6 C12.2 58.25,61.6 ; R12.1 63.827,71.573 63.856,71.544 63.856,69.615 64.427,69.044 R17.1 ; R12.2 63.827,74.427 63.856,74.456 63.856,75.456 64.5,76.1 64.5,77.75 60.924,81.326 60.924,83.576 58.573,85.927 56.75,85.927 C5.2 52.927,87.25 51.25,87.25 ; C4.1@24.25,87.5 35.5,87.5 37,89 45.75,89 47.5,87.25 51.25,87.25
NetC1_1: C1.1 C2.1 L1.1 R1.1 R10.2 U1.6 | length 22.3
  Top Layer w0.4: R1.1 48.479,83.203 48.953,83.203 49.25,83.5 U1.6@50.175,83.5 ; C2.1 50.25,81.726 U1.6@50.25,83.55
  Top Layer w1: L1.1 45,77.75 47.194,79.944 52.936,79.944 ; C2.1 50.024,80.61 50.59,80.044 ; 53.007,79.874 53.079,79.802 53.623,79.802 C1.1 53.851,79.674 54.025,79.5 R10.2
NetC3_2: C3.2 C4.2 D1.1 D2.2 | length 27.4
  Top Layer w1: D2.2@29.187,93 21.75,93 20,91.25 20,86.5 22.151,84.349 C4.2 C3.2 30.549,84.349 D1.1
NetC5_1: C5.1 U1.2 | length 2.2
  Top Layer w0.254: U1.2 53.927,84.25 C5.1
NetC6_1: C6.1 C7.1 L2.1 R3.1 R11.2 U2.6 | length 24.6
  Top Layer w0.254: R3.1@47.777,41.973 48.453,42.65 U2.6
  Top Layer w0.4: R3.1 R3.1@47.777,41.973 ; C7.1 U2.6@49.524,42.6
  Top Layer w1: L2.1 45.143,38 46.067,38.924 49.674,38.924 C6.1 56.924,38.924 R11.2
  Top Layer w1.2: C7.1@49.5,40.5 cw(c50.7,40.5) 49.513,40.679 C7.1 49.524,40.5 49.524,39.074 49.674,38.924
NetC8_2: C8.2 C9.2 D10.1 D11.2 | length 29.3
  Top Layer w1.2: D11.2@29.187,33 23.25,33 20.25,36 20.25,43.5 21.099,44.349 C9.2 C8.2 28.601,44.701 31.301,44.701 D10.1
NetC10_1: C10.1 U2.2 | length 2.3
  Top Layer w0.254: U2.2 52.598,43.3 ccw(c52.598,43.554) 52.752,43.352 53.171,43.671 C10.1
NetD1_2: D1.2 L1.2 U1.4 | length 17.6
  Top Layer w0.4: 50.196,85.5 50.275,85.421 U1.4@50.275,85
  Top Layer w0.6: 49.996,85.75 50.196,85.55 50.196,85.5
  Top Layer w1: D1.2 36.25,85.25 37.75,86.75 L1.2 44.625,86.75 45.625,85.75 49.996,85.75
NetD2_1: D2.1 D3.2 | length 16.4
  Top Layer w1.2: D2.1@32.812,93 D3.2@49.187,93
NetD3_1: D3.1 D4.2 | length 16.4
  Top Layer w1.2: D3.1@52.813,93 D4.2@69.187,93
NetD4_1: D4.1 D5.2 | length 17.3
  Top Layer w1.2: 73.75,93 72.813,93 73.24,93 D5.2@89.188,93
NetD5_1: D5.1 D9.2 | length 60.6
  Top Layer w1.2: D9.2@92.813,53 103.253,53 ccw(c103.253,54.2) 104.1,53.35 105.4,54.65 ccw(c104.55,55.497) 105.75,55.497 105.75,85.753 ccw(c104.55,85.753) 105.4,86.6 105.399,86.601 99,93 D5.1@92.813,93
NetD6_1: D6.1 R9.2 | length 70.2
  Top Layer w0.254: D6.1@29.187,53 D6.1@29.615,52.573
  Top Layer w1: 17.5,53 D6.1@29.187,53 ; 56.5,68.4 R9.2@56.5,71.25
  Top Layer w1.2: 17.5,53 15.25,55.25 15.25,59.75 16.5,61 43,61 44.5,62.5 44.5,66.55 cw(c45.7,66.55) 45.7,67.75 55.281,67.75 ccw(c55.281,69.217) 56.5,68.4
NetD6_2: D6.2 D7.1 | length 16.4
  Top Layer w1.2: D6.2@32.812,53 D7.1@49.187,53
NetD7_2: D7.2 D8.1 | length 16.4
  Top Layer w1.2: D7.2@52.813,53 60.141,52.971 ccw(c60.144,53.825) 60.144,52.971 61.856,52.971 ccw(c61.856,53.825) 61.859,52.971 D8.1@69.187,53
NetD8_2: D8.2 D9.1 | length 16.4
  Top Layer w1.2: D8.2@72.813,53 D9.1@89.188,53
NetD10_2: D10.2 L2.2 U2.4 | length 17.9
  Top Layer w0.4: 49.146,45.208 49.25,45.208 49.525,44.933 U2.4
  Top Layer w1.2: D10.2 35.75,44.75 38,47 L2.2 ; L2.2@41.155,47 42.15,46.6 44.685,46.55 44.88,46.55 46.148,45.283 49.071,45.283 49.146,45.208
NetD11_1: D11.1 D12.2 | length 16.4
  Top Layer w1.2: D11.1@32.812,33 D12.2@49.187,33
NetD12_1: D12.1 D13.2 | length 16.4
  Top Layer w1.2: D12.1@52.813,33 53.195,33 ccw(c53.197,33.854) 53.199,33 61.188,33.027 cw(c61.193,31.573) 61.197,33.027 D13.2@69.187,33
NetD13_1: D13.1 D14.2 | length 16.4
  Top Layer w1.2: D13.1@72.813,33 D14.2@89.188,33
NetD14_1: D14.1 R7.1 | length 21.6
  Top Layer w1: 97,49.25 R7.1
  Top Layer w1.2: D14.1@92.813,33 95,33 96.926,34.926 ccw(c96.746,35.105) 97,35.105 97,49.25
NetD15_1: D15.1 R8.2 | length 109.2
  Top Layer w1: 61.193,27.44 R8.2
  Top Layer w1.2: D15.1@29.187,73 16.5,73 13.351,69.851 ccw(c14.2,69.003) 13,69.003 13,35.247 ccw(c14.2,35.247) 13.35,34.4 21.65,26.1 ccw(c22.497,26.95) 22.497,25.75 59.503,25.75 ccw(c59.503,26.95) 60.35,26.1 60.842,26.592 ccw(c59.993,27.44) 61.193,27.44
NetD15_2: D15.2 D16.1 | length 16.4
  Top Layer w1.2: D15.2@32.812,73 D16.1@49.187,73
NetD16_2: D16.2 D17.1 | length 16.4
  Top Layer w1.2: D16.2@52.813,73 52.84,73.027 69.16,73.027 D17.1@69.187,73
NetD17_2: D17.2 D18.1 | length 16.4
  Top Layer w1.2: D17.2@72.813,73 D18.1@89.188,73
NetD18_2: D18.2 R7.2 | length 22.2
  Top Layer w1: R7.2 97,55.5
  Top Layer w1.2: D18.2@92.813,73 96,73 97,72 97,55.5
NetD19_2: D19.2 F1.2 | length 3
  Top Layer w1.2: F1.2 D19.2
NetF1_1: F1.1 J1.1 | length 15.5
  Top Layer w1.2: J1.1@17.6,68.5 23.7,68.5 23.95,68.25 25.75,68.25 29,65 F1.1
NetR1_2: R1.2 U1.5 | length 2.1
  Top Layer w0.254: R1.2 48.579,84.25 U1.5
NetR2_2: R2.2 R9.1 U1.1 | length 14.3
  Top Layer w0.254: U1.1 52.9,83.6 53.25,83.25
  Top Layer w0.4: 53.25,83.25 53.5,83.25 53.75,83
  Top Layer w1: 53.75,83 53.925,82.943 53.979,82.925 ccw(c54.288,83.876) 54.288,82.876 56.425,82.875 R2.2 57.025,82.825 57.075,82.775 57.075,82.5 57.75,81.825 57.75,77.25 56.5,76 R9.1
NetR3_2: R3.2 U2.5 | length 1.9
  Top Layer w0.254: R3.2 47.977,43.3 U2.5
NetR4_2: R4.2 R8.1 U2.1 | length 16.9
  Top Layer w0.254: U2.1 R4.2@55.825,42.65
  Top Layer w0.4: R4.2@55.825,42.65 R4.2
  Top Layer w1: R4.2@55.675,42.775 R4.2 58.379,42.825 61.224,39.979 61.224,37.676 61.193,37.644 R8.1
NetR5_2: R5.2 R10.1 | length 6.3
  Top Layer w1: R10.1 59.177,79.173 59.206,79.144 60.164,79.144 60.75,78.558 R5.2
NetR6_2: R6.2 R11.1 | length 9.4
  Top Layer w1: R11.1 60.278,42.74 60.278,42.781 61,43.504 R6.2
VIN: C11.1 C12.1 D19.1 D20.1 R5.1 R6.1 | length 33.3
  Top Layer w1: C12.1@60.75,64.739 R5.1 ; R6.1 61.124,54.354 61.153,54.383 61.153,56.237
  Top Layer w1.2: D19.1 49.25,65 49.7,65.45 D20.1 52.48,64.97 53.53,64.97 54,64.5 55.9,64.5 C11.1 C12.1 60.75,64.4 62.297,64.4 63,63.697 63,58.084 61.153,56.237
pads on no net: "D2.Thermal Pad" "D3.Thermal Pad" "D4.Thermal Pad" "D5.Thermal Pad" "D6.Thermal Pad" "D7.Thermal Pad" "D8.Thermal Pad" "D9.Thermal Pad" "D11.Thermal Pad" "D12.Thermal Pad" "D13.Thermal Pad" "D14.Thermal Pad" "D15.Thermal Pad" "D16.Thermal Pad" "D17.Thermal Pad" "D18.Thermal Pad" J1.MH1 J1.MH2 U1.7@51.25,83.8 U1.7@51.25,84.7 U2.7@50.5,42.85 U2.7@50.5,43.75

## Polygon pours and split planes (outlines as drawn)
GND on Top Layer "GND_L01_P000" (solid, pour order 0): 11,113 11,13 111,13 111,113

## Other copper
Top Layer:
  region: 50.25,31.25 49.75,30.75 47.75,30.75 47.5,30.5 47.5,29 47.75,28.75 54.25,28.75 54.5,29 54.5,30.5 54.25,30.75 52.25,30.75 51.75,31.25 51.75,34.75 52.25,35.25 54.25,35.25 54.5,35.5 54.5,36.75 54.25,37 47.75,37 47.5,36.75 47.5,35.5 47.75,35.25 49.75,35.25 50.25,34.75
  pour cut-out: 46,46.25 36,46.25 36,38.5 46,38.5
  pour cut-out: 46,85.75 36,85.75 36,78 46,78
  region: 30.25,91.25 29.75,90.75 27.75,90.75 27.5,90.5 27.5,89 27.75,88.75 34.25,88.75 34.5,89 34.5,90.5 34.25,90.75 32.25,90.75 31.75,91.25 31.75,94.75 32.25,95.25 34.25,95.25 34.5,95.5 34.5,96.75 34.25,97 27.75,97 27.5,96.75 27.5,95.5 27.75,95.25 29.75,95.25 30.25,94.75
  region: 50.25,91.25 49.75,90.75 47.75,90.75 47.5,90.5 47.5,89 47.75,88.75 54.25,88.75 54.5,89 54.5,90.5 54.25,90.75 52.25,90.75 51.75,91.25 51.75,94.75 52.25,95.25 54.25,95.25 54.5,95.5 54.5,96.75 54.25,97 47.75,97 47.5,96.75 47.5,95.5 47.75,95.25 49.75,95.25 50.25,94.75
  region: 70.25,91.25 69.75,90.75 67.75,90.75 67.5,90.5 67.5,89 67.75,88.75 74.25,88.75 74.5,89 74.5,90.5 74.25,90.75 72.25,90.75 71.75,91.25 71.75,94.75 72.25,95.25 74.25,95.25 74.5,95.5 74.5,96.75 74.25,97 67.75,97 67.5,96.75 67.5,95.5 67.75,95.25 69.75,95.25 70.25,94.75
  region: 90.25,91.25 89.75,90.75 87.75,90.75 87.5,90.5 87.5,89 87.75,88.75 94.25,88.75 94.5,89 94.5,90.5 94.25,90.75 92.25,90.75 91.75,91.25 91.75,94.75 92.25,95.25 94.25,95.25 94.5,95.5 94.5,96.75 94.25,97 87.75,97 87.5,96.75 87.5,95.5 87.75,95.25 89.75,95.25 90.25,94.75
  region: 90.25,71.25 89.75,70.75 87.75,70.75 87.5,70.5 87.5,69 87.75,68.75 94.25,68.75 94.5,69 94.5,70.5 94.25,70.75 92.25,70.75 91.75,71.25 91.75,74.75 92.25,75.25 94.25,75.25 94.5,75.5 94.5,76.75 94.25,77 87.75,77 87.5,76.75 87.5,75.5 87.75,75.25 89.75,75.25 90.25,74.75
  region: 70.25,71.25 69.75,70.75 67.75,70.75 67.5,70.5 67.5,69 67.75,68.75 74.25,68.75 74.5,69 74.5,70.5 74.25,70.75 72.25,70.75 71.75,71.25 71.75,74.75 72.25,75.25 74.25,75.25 74.5,75.5 74.5,76.75 74.25,77 67.75,77 67.5,76.75 67.5,75.5 67.75,75.25 69.75,75.25 70.25,74.75
  region: 50.25,71.25 49.75,70.75 47.75,70.75 47.5,70.5 47.5,69 47.75,68.75 54.25,68.75 54.5,69 54.5,70.5 54.25,70.75 52.25,70.75 51.75,71.25 51.75,74.75 52.25,75.25 54.25,75.25 54.5,75.5 54.5,76.75 54.25,77 47.75,77 47.5,76.75 47.5,75.5 47.75,75.25 49.75,75.25 50.25,74.75
  region: 30.25,71.25 29.75,70.75 27.75,70.75 27.5,70.5 27.5,69 27.75,68.75 34.25,68.75 34.5,69 34.5,70.5 34.25,70.75 32.25,70.75 31.75,71.25 31.75,74.75 32.25,75.25 34.25,75.25 34.5,75.5 34.5,76.75 34.25,77 27.75,77 27.5,76.75 27.5,75.5 27.75,75.25 29.75,75.25 30.25,74.75
  region: 30.25,51.25 29.75,50.75 27.75,50.75 27.5,50.5 27.5,49 27.75,48.75 34.25,48.75 34.5,49 34.5,50.5 34.25,50.75 32.25,50.75 31.75,51.25 31.75,54.75 32.25,55.25 34.25,55.25 34.5,55.5 34.5,56.75 34.25,57 27.75,57 27.5,56.75 27.5,55.5 27.75,55.25 29.75,55.25 30.25,54.75
  region: 50.25,51.25 49.75,50.75 47.75,50.75 47.5,50.5 47.5,49 47.75,48.75 54.25,48.75 54.5,49 54.5,50.5 54.25,50.75 52.25,50.75 51.75,51.25 51.75,54.75 52.25,55.25 54.25,55.25 54.5,55.5 54.5,56.75 54.25,57 47.75,57 47.5,56.75 47.5,55.5 47.75,55.25 49.75,55.25 50.25,54.75
  region: 70.25,51.25 69.75,50.75 67.75,50.75 67.5,50.5 67.5,49 67.75,48.75 74.25,48.75 74.5,49 74.5,50.5 74.25,50.75 72.25,50.75 71.75,51.25 71.75,54.75 72.25,55.25 74.25,55.25 74.5,55.5 74.5,56.75 74.25,57 67.75,57 67.5,56.75 67.5,55.5 67.75,55.25 69.75,55.25 70.25,54.75
  region: 90.25,51.25 89.75,50.75 87.75,50.75 87.5,50.5 87.5,49 87.75,48.75 94.25,48.75 94.5,49 94.5,50.5 94.25,50.75 92.25,50.75 91.75,51.25 91.75,54.75 92.25,55.25 94.25,55.25 94.5,55.5 94.5,56.75 94.25,57 87.75,57 87.5,56.75 87.5,55.5 87.75,55.25 89.75,55.25 90.25,54.75
  region: 90.25,31.25 89.75,30.75 87.75,30.75 87.5,30.5 87.5,29 87.75,28.75 94.25,28.75 94.5,29 94.5,30.5 94.25,30.75 92.25,30.75 91.75,31.25 91.75,34.75 92.25,35.25 94.25,35.25 94.5,35.5 94.5,36.75 94.25,37 87.75,37 87.5,36.75 87.5,35.5 87.75,35.25 89.75,35.25 90.25,34.75
  region: 70.25,31.25 69.75,30.75 67.75,30.75 67.5,30.5 67.5,29 67.75,28.75 74.25,28.75 74.5,29 74.5,30.5 74.25,30.75 72.25,30.75 71.75,31.25 71.75,34.75 72.25,35.25 74.25,35.25 74.5,35.5 74.5,36.75 74.25,37 67.75,37 67.5,36.75 67.5,35.5 67.75,35.25 69.75,35.25 70.25,34.75
  region: 30.25,31.25 29.75,30.75 27.75,30.75 27.5,30.5 27.5,29 27.75,28.75 34.25,28.75 34.5,29 34.5,30.5 34.25,30.75 32.25,30.75 31.75,31.25 31.75,34.75 32.25,35.25 34.25,35.25 34.5,35.5 34.5,36.75 34.25,37 27.75,37 27.5,36.75 27.5,35.5 27.75,35.25 29.75,35.25 30.25,34.75

## Silkscreen, mask and mechanical layers (free items; w line width, h text height)
Mechanical 1:
  lines w0.1: 5,13 120,13 ; 5,33 120,33 ; 5,53 120,53 ; 5,73 120,73 ; 5,93 120,93 ; 5,113 120,113 ; 11,7 11,122 ; 31,7 31,122 ; 51,7 51,122 ; 71,7 71,122 ; 91,7 91,122 ; 111,7 111,122
  lines w0.254: 11,13 111,13 111,113 11,113 11,13

## Text inside footprints (layer, text, board x,y; h text height)
D2: Top Overlay "+" at 28.7,93.45 h1.02 r180
D3: Top Overlay "+" at 48.7,93.45 h1.02 r180
D4: Top Overlay "+" at 68.7,93.45 h1.02 r180
D5: Top Overlay "+" at 88.7,93.45 h1.02 r180
D6: Top Overlay "+" at 33.3,52.55 h1.02
D7: Top Overlay "+" at 53.3,52.55 h1.02
D8: Top Overlay "+" at 73.3,52.55 h1.02
D9: Top Overlay "+" at 93.3,52.55 h1.02
D11: Top Overlay "+" at 28.7,33.45 h1.02 r180
D12: Top Overlay "+" at 48.7,33.45 h1.02 r180
D13: Top Overlay "+" at 68.7,33.45 h1.02 r180
D14: Top Overlay "+" at 88.7,33.45 h1.02 r180
D15: Top Overlay "+" at 33.3,72.55 h1.02
D16: Top Overlay "+" at 53.3,72.55 h1.02
D17: Top Overlay "+" at 73.3,72.55 h1.02
D18: Top Overlay "+" at 93.3,72.55 h1.02